# Altium PCB NB3000XN.PcbDoc (part 49 of 71)
Units mil, origin at the board's own origin, x right, y up, seen from the top; angles counter-clockwise.
Board outline 9527.56 x 6929.77 mil, 6 copper layers (Top Layer, GND+SHIELD, MidLayer1, MidLayer2, P2 - 3V3+5V0, Bottom Layer), stack 62.375 mil thick; 832 components, 1027 nets, 4655 pads, 4981 vias.
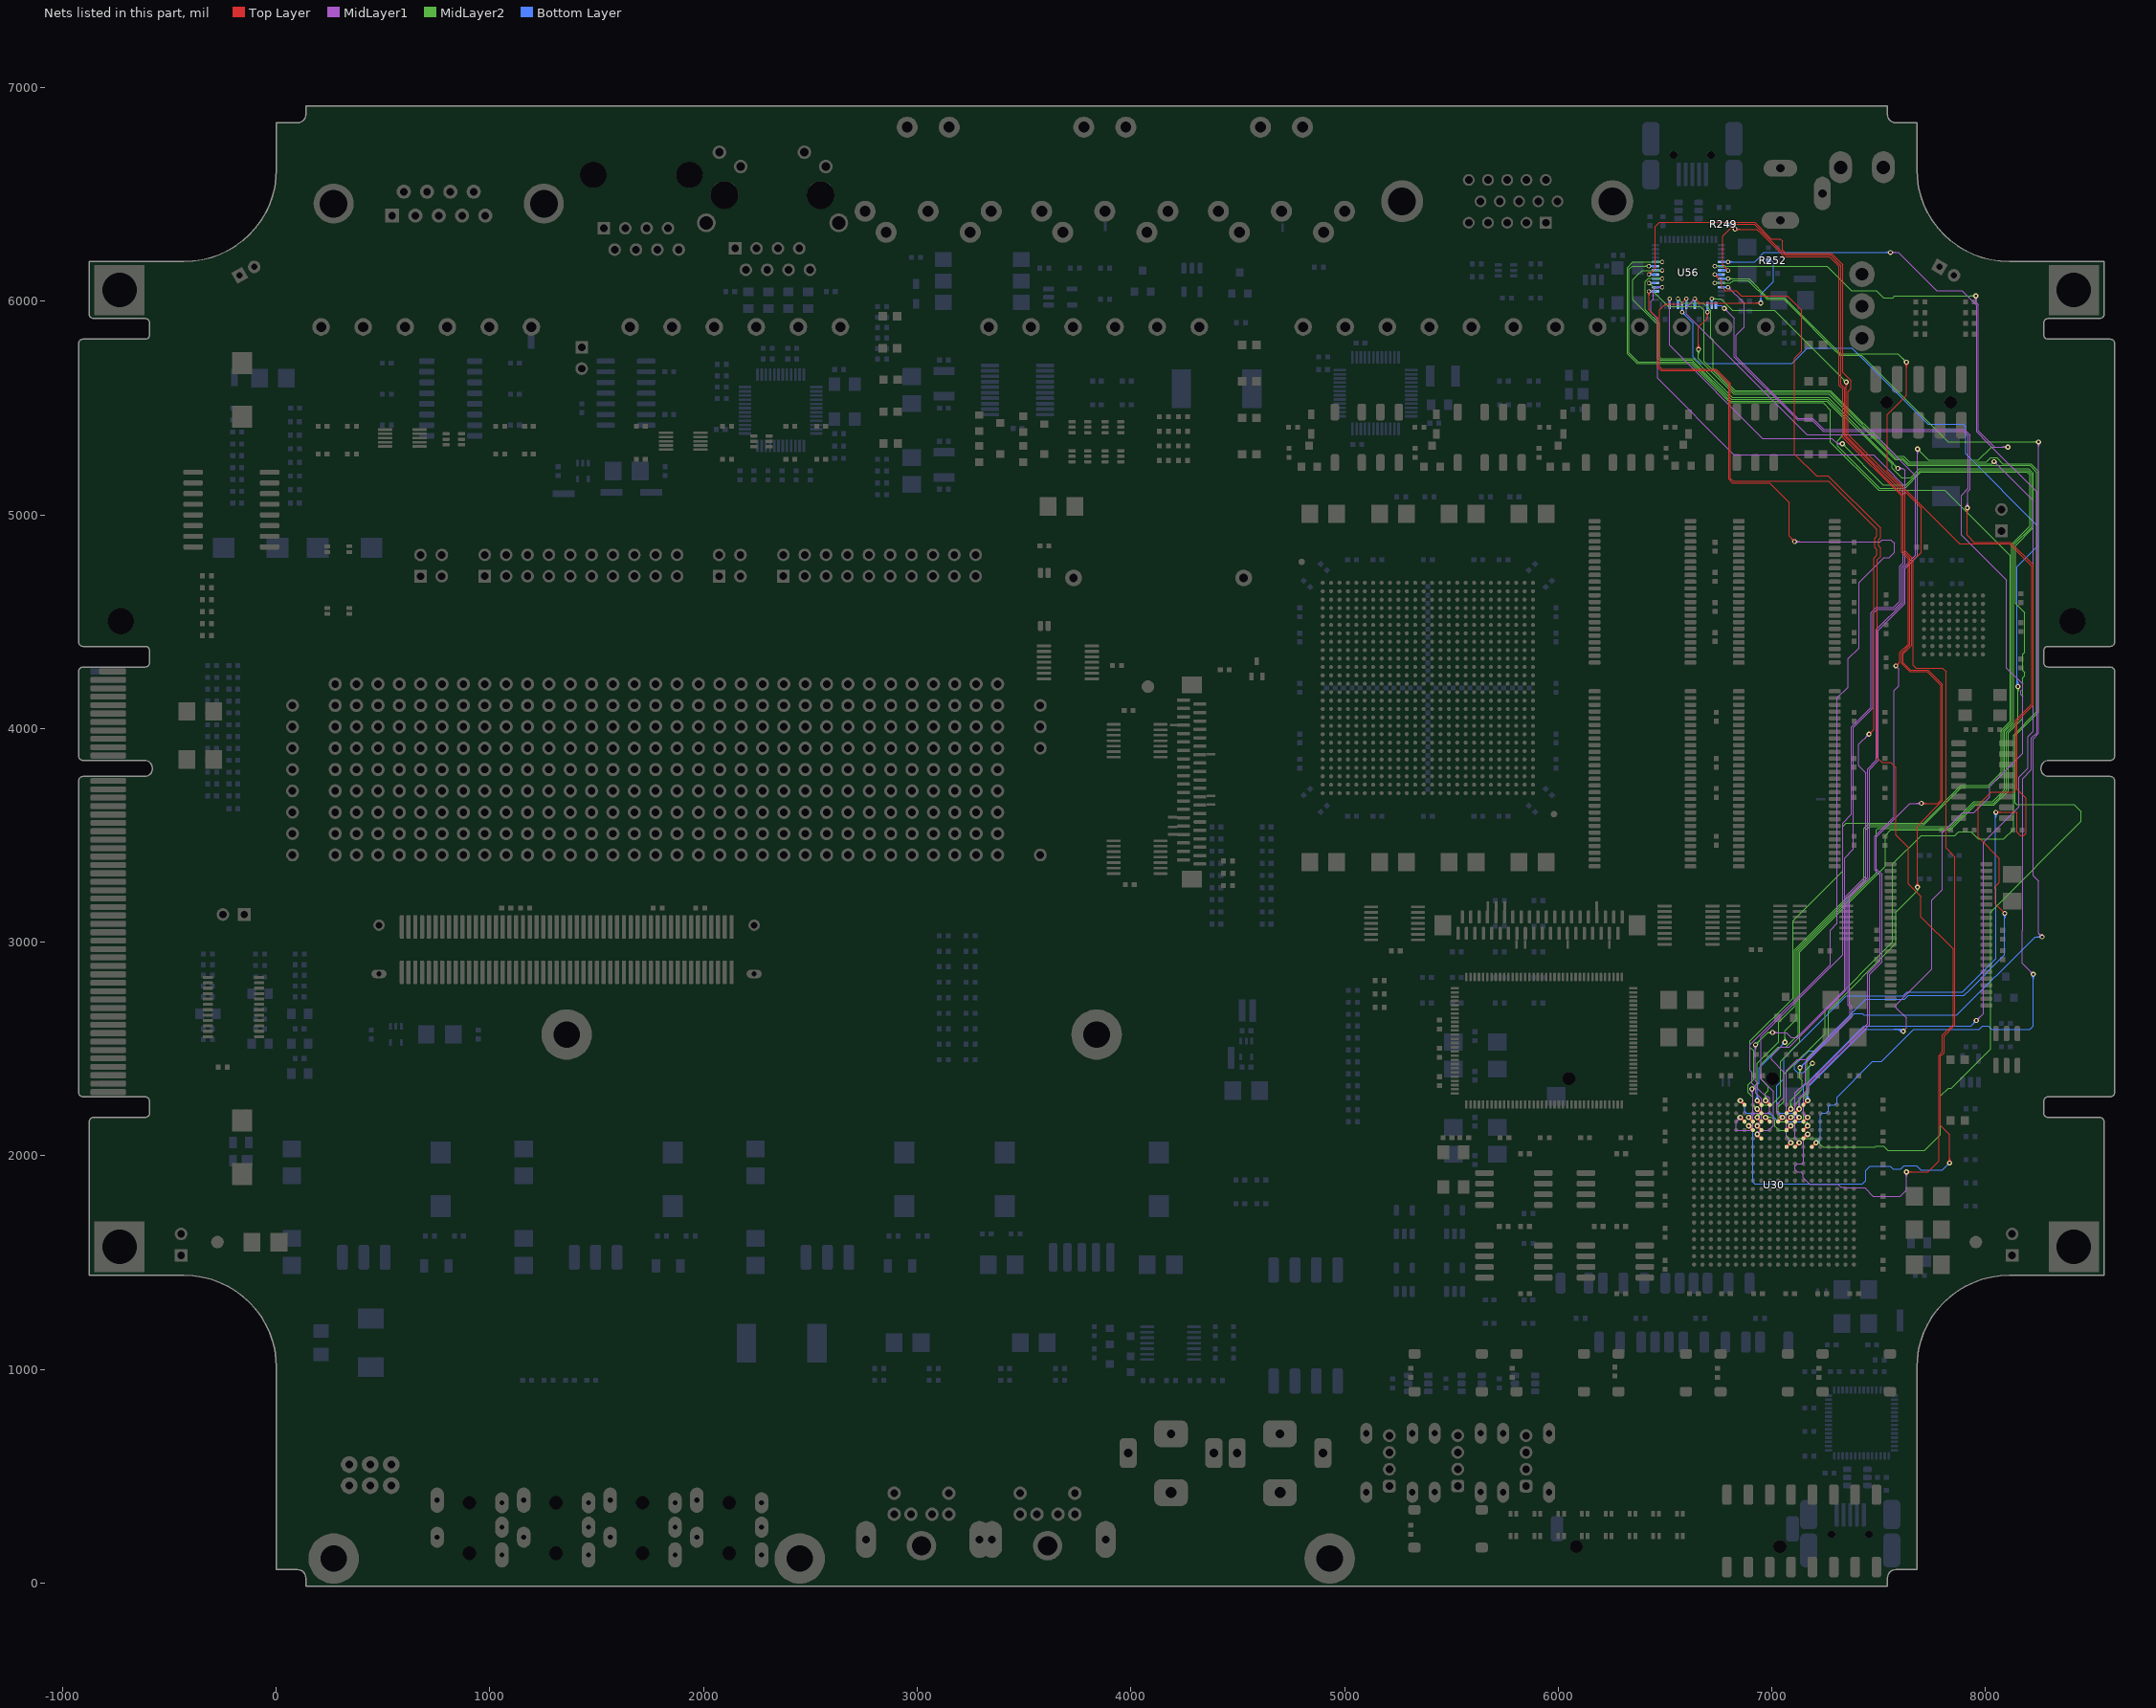
[diagram p53: the nets of this part, all layers, seen from the top]

## Via types
v1: diameter 23, hole 11.81, Top Layer to Bottom Layer, 3672 vias
v2: diameter 26, hole 11.81, Top Layer to Bottom Layer, 461 vias
v3: diameter 19, hole 11.81, Top Layer to Bottom Layer, tented both sides, 396 vias
v4: diameter 23.62, hole 11.81, Top Layer to Bottom Layer, 288 vias
v5: diameter 20, hole 11.81, Top Layer to Bottom Layer, 91 vias
v6: diameter 23, hole 11.81, Top Layer to Bottom Layer, tented both sides, 50 vias
v7: diameter 31, hole 11.81, Top Layer to Bottom Layer, 15 vias
v8: diameter 27.56, hole 11.81, Top Layer to Bottom Layer, tented both sides, 4 vias
v9: diameter 29, hole 11.81, Top Layer to Bottom Layer, 3 vias
v10: diameter 21, hole 11.81, Top Layer to Bottom Layer, 1 vias

## Nets (pads, with @x,y where several pads share a name; then routed paths per layer and width w, separated by ;. In a path a pad name is that pad's centre, name@x,y a point inside that pad or via, vN(x,y) a via of type N, cw(c..) or ccw(c..) an arc to the next point about the centre after c; other vN are vias at no path point) (continued)
HOST_USB.D1: U30.F6 U56.19 | length 6639.8
  Top Layer w8: U30.F6@7187.17,2042.17 v2(7206.85,2061.85) ; U30.F6@7187.17,2048.01 ccw(c7187.17,2062.11) 7197.14,2052.14 ccw(c7207.11,2042.17) U30.F6@7193.01,2042.17 ; v2@7197.85,2061.85 cw(c7176.12,2061.85) 7191.49,2046.49 cw(c7206.85,2031.12) v2@7206.85,2052.85
  MidLayer1 w4: v1(7554.86,6228.37) 7592.21,6228.37 7770.54,6050.04 7889.61,6050.04 7958.81,5980.84 7958.81,5388.73 8004.44,5343.11 8240.52,5107.02 8240.52,3980.73 8215.19,3955.39 8215.19,3808.37 8173.52,3766.71 8173.52,3055 ; v1@7558.75,6224.49 cw(c7568.14,6215.1) 7568.14,6228.37 cw(c7568.14,6241.65) v1@7558.75,6232.26 ; v1@7561.57,6221.66 cw(c7577.79,6205.44) 7577.79,6228.37 cw(c7577.79,6251.31) v1@7561.57,6235.09 ; 8175,3055 8173.19,3053.19 8173.19,2900.37 v1(8223.52,2850.04) ; v1@8214.02,2850.04 ccw(c8191.09,2850.04) 8207.31,2866.26 ccw(c8223.52,2882.48) v1@8223.52,2859.54 ; v1@8218.02,2850.04 ccw(c8204.75,2850.04) 8214.14,2859.43 ccw(c8223.52,2868.82) v1@8223.52,2855.54
  Bottom Layer w4: v5(6795.66,6184.21) 6919.36,6184.21 6963.52,6228.37 v1(7554.86,6228.37) ; v5@6801.32,6178.56 cw(c6814.97,6164.9) 6814.97,6184.21 cw(c6814.98,6203.53) v5@6801.32,6189.87 ; v2(7206.85,2061.85) 7206.85,2069.37 7214.38,2069.37 7227.19,2082.19 7227.19,2191.71 7235.52,2200.04 7254.19,2200.04 7265.52,2211.37 7265.52,2233.37 7271.19,2239.04 7293.86,2239.04 7304.86,2250.04 7304.86,2275.04 7471.52,2441.71 7514.52,2441.71 7664.52,2591.71 7969.52,2591.71 7986.19,2608.37 8012.86,2608.37 8029.52,2591.71 8206.86,2591.71 8223.52,2608.37 v1(8223.52,2850.04) ; v2@7206.85,2068.85 ccw(c7206.85,2085.75) 7218.8,2073.8 ; v2@7206.85,2072.85 ccw(c7206.85,2099.41) 7225.63,2080.63 ccw(c7244.41,2061.85) v2@7217.85,2061.85 ; v2@7213.85,2061.85 cw(c7230.75,2061.85) 7218.8,2073.8 ; v1@7548.14,6221.66 ccw(c7531.92,6205.44) 7531.92,6228.37 ccw(c7531.92,6251.31) v1@7548.14,6235.09 ; v1@7550.97,6224.49 ccw(c7541.58,6215.1) 7541.58,6228.37 ccw(c7541.58,6241.65) v1@7550.97,6232.26 ; v1@8216.81,2843.32 cw(c8200.59,2827.11) 8223.52,2827.11 cw(c8246.46,2827.11) v1@8230.24,2843.32 ; v1@8219.64,2846.15 cw(c8210.25,2836.76) 8223.52,2836.76 cw(c8236.8,2836.76) v1@8227.41,2846.15
  Bottom Layer w8: U56.19@6764.33,6184.21 v5(6795.66,6184.21) ; v5@6791.42,6179.97 ccw(c6781.18,6169.73) 6781.18,6184.21 ccw(c6781.17,6198.7) v5@6791.42,6188.46
HOST_USB.D2: U30.H6 U56.20 | length 6594.3
  Top Layer w8: U30.H6@7108.43,2042.17 v2(7128.11,2061.85) ; U30.H6@7108.43,2048.01 ccw(c7108.43,2062.11) 7118.4,2052.14 ccw(c7128.37,2042.17) U30.H6@7114.27,2042.17 ; v2@7119.11,2061.85 cw(c7097.38,2061.85) 7112.75,2046.49 cw(c7128.11,2031.12) v2@7128.11,2052.85
  MidLayer1 w4: v2(7128.11,2061.85) 7128.11,2058.37 7131.86,2058.37 7131.86,2060.37 7108.86,2083.37 7108.86,2293.71 7156.86,2341.71 7156.86,2433.37 7374.34,2650.86 7374.34,2698.16 7364.52,2707.98 7364.52,3210.08 7456.86,3302.41 7456.86,3808.37 7498.52,3850.04 7498.52,4459.84 7623.86,4585.17 7623.86,4749.77 7681.86,4807.77 v1(7681.86,5308.37) ; v1@7675.14,5301.66 cw(c7658.92,5285.44) 7681.86,5285.44 cw(c7704.79,5285.44) v1@7688.57,5301.66 ; v1@7677.97,5304.49 cw(c7668.58,5295.1) 7681.86,5295.1 cw(c7695.14,5295.1) v1@7685.75,5304.49 ; v4@7948.06,6018.06 cw(c7931.31,6001.31) 7955,6001.31 cw(c7978.69,6001.31) v4@7961.94,6018.06 ; v4@7950.89,6020.89 cw(c7940.97,6010.97) 7955,6010.97 cw(c7969.03,6010.97) v4@7959.11,6020.89 ; v4(7955,6025) 7955,5995.96 7966.81,5984.15 7966.81,5393.19 8042.19,5317.81 v4(8105,5317.81) ; v4@8098.06,5310.87 ccw(c8081.31,5294.13) 8081.31,5317.81 ccw(c8081.31,5341.5) v4@8098.06,5324.75 ; v4@8100.89,5313.7 ccw(c8090.97,5303.78) 8090.97,5317.81 ccw(c8090.97,5331.84) v4@8100.89,5321.92
  MidLayer2 w4: v5(6733,6164.53) 7259.04,6164.53 7373.52,6050.04 7490.19,6050.04 7523.04,6017.19 7567.19,6017.19 7575,6025 v4(7955,6025) ; v5@6738.66,6158.87 cw(c6752.31,6145.21) 6752.31,6164.53 cw(c6752.31,6183.84) v5@6738.66,6170.18 ; v1@7681.86,5298.87 cw(c7681.86,5275.94) 7698.07,5292.16 cw(c7714.29,5308.37) v1@7691.36,5308.37 ; v1@7681.86,5302.87 cw(c7681.86,5289.6) 7691.25,5298.99 cw(c7700.64,5308.37) v1@7687.36,5308.37 ; v1(7681.86,5308.37) 7734.23,5256 7966,5256 8027.81,5317.81 v4(8105,5317.81) ; v4@7948.06,6018.06 ccw(c7931.31,6001.31) 7931.31,6025 ccw(c7931.31,6048.69) v4@7948.06,6031.94 ; v4@7950.89,6020.89 ccw(c7940.97,6010.97) 7940.97,6025 ccw(c7940.97,6039.03) v4@7950.89,6029.11 ; v4@8098.06,5310.87 ccw(c8081.31,5294.13) 8081.31,5317.81 ccw(c8081.31,5341.5) v4@8098.06,5324.75 ; v4@8100.89,5313.7 ccw(c8090.97,5303.78) 8090.97,5317.81 ccw(c8090.97,5331.84) v4@8100.89,5321.92
  Bottom Layer w8: v5(6733,6164.53) U56.20@6764.33,6164.53 ; v5@6737.24,6160.28 cw(c6747.49,6150.04) 6747.49,6164.53 cw(c6747.49,6179.01) v5@6737.24,6168.77
HOST_USB.D3: U30.G3 U56.21 | length 5809.5
  Top Layer w4: 6782.01,6158.5 cw(c6768.35,6144.84) v5@6787.66,6144.84 ; 6782,6158.5 ccw(c6795.66,6172.16) v5@6795.66,6152.84 ; v5(6795.66,6144.84) 6770,6170.5 6770,6304.85 6825.19,6360.04 6917.84,6360.04 7061.17,6216.71 7273.52,6216.71 7323.52,6166.71 7323.52,5610 7340.52,5593 7340.52,5366.37 7363.05,5343.85 7615.19,5091.71 7615.19,4828.37 7646.52,4797.04 7646.52,4392.69 7606.86,4353.02 7606.86,4305 7644.86,4267 7726.69,4267 7791.19,4202.5 7791.19,3665.33 7775.86,3650 v1(7700,3650) ; v1@7703.89,3646.11 cw(c7713.28,3636.72) 7713.28,3650 cw(c7713.28,3663.28) v1@7703.89,3653.89 ; v1@7706.72,3643.28 cw(c7722.94,3627.06) 7722.94,3650 cw(c7722.94,3672.93) v1@7706.72,3656.72
  Top Layer w8: U30.G3@7147.8,2160.28 v2(7167.48,2179.96) ; U30.G3@7147.8,2166.12 ccw(c7147.8,2180.22) 7157.77,2170.25 ccw(c7167.74,2160.28) U30.G3@7153.64,2160.28 ; v2@7158.48,2179.96 cw(c7136.75,2179.96) 7152.12,2164.6 cw(c7167.48,2149.23) v2@7167.48,2170.96
  MidLayer1 w4: v2@7156.48,2179.96 ccw(c7129.92,2179.96) 7148.7,2198.74 ccw(c7167.48,2217.52) v2@7167.48,2190.96 ; v2@7160.48,2179.96 ccw(c7143.58,2179.96) 7155.53,2191.91 ccw(c7167.48,2203.86) v2@7167.48,2186.96 ; v2(7167.48,2179.96) 7148.19,2199.25 7148.19,2275.37 7173.19,2300.37 7173.19,2331.67 7457.19,2615.67 7457.19,2850.37 7515.19,2908.37 7515.19,3316.71 7490.19,3341.71 7490.19,3493.33 7646.86,3650 v1(7700,3650) ; v1@7693.28,3643.28 ccw(c7677.06,3627.06) 7677.06,3650 ccw(c7677.06,3672.93) v1@7693.28,3656.72 ; v1@7696.11,3646.11 ccw(c7686.72,3636.72) 7686.72,3650 ccw(c7686.72,3663.28) v1@7696.11,3653.89
  Bottom Layer w8: U56.21@6764.33,6144.84 v5(6795.66,6144.84) ; v5@6791.42,6140.6 ccw(c6781.18,6130.36) 6781.18,6144.84 ccw(c6781.18,6159.33) v5@6791.42,6149.09
HOST_USB.D4: U30.G5 U56.22 | length 6301.8
  Top Layer w4: v5@6733,6117.16 cw(c6733,6097.84) 6746.66,6111.5 cw(c6760.31,6125.16) v5@6741,6125.16 ; v5(6733,6125.16) 6765.19,6092.97 6765.19,6066.71 6781.86,6050.04 6831.86,6050.04 6856.86,6025.04 7073.52,6025.04 7140.19,5958.37 7140.19,5767.14 7106.52,5733.48 7106.52,5284.79 7208.27,5183.04 7263.15,5183.04 7508.19,4938 7508.19,4894.69 7499.19,4885.69 7499.19,4854.31 7508.19,4845.31 7508.19,4804.41 7494.19,4790.41 7494.19,3862.71 7515.19,3841.71 7556.86,3841.71 7581.86,3816.71 7581.86,3501.02 7640.19,3442.69 7640.19,3273.37 7698.19,3215.37 7698.19,3119 7849.19,2968 7849.19,2615 7798.52,2564.34 7798.52,2486.36 7781.86,2469.69 7781.86,1976.86 7730,1925 v1(7630,1925) ; v1@7633.89,1921.11 cw(c7643.28,1911.72) 7643.28,1925 cw(c7643.28,1938.28) v1@7633.89,1928.89 ; v1@7636.72,1918.28 cw(c7652.94,1902.06) 7652.94,1925 cw(c7652.94,1947.93) v1@7636.72,1931.72
  Top Layer w8: U30.G5@7147.8,2081.54 v2(7167.48,2101.22) ; U30.G5@7147.8,2087.38 ccw(c7147.8,2101.48) 7157.77,2091.51 ccw(c7167.74,2081.54) U30.G5@7153.64,2081.54 ; v2@7158.48,2101.22 cw(c7136.75,2101.22) 7152.12,2085.86 cw(c7167.48,2070.49) v2@7167.48,2092.22
  MidLayer1 w4: v2@7156.48,2101.22 cw(c7129.92,2101.22) 7148.7,2082.44 cw(c7167.48,2063.67) v2@7167.48,2090.22 ; v2@7160.48,2101.22 cw(c7143.58,2101.22) 7155.53,2089.27 cw(c7167.48,2077.32) v2@7167.48,2094.22 ; v2(7167.48,2101.22) 7148.19,2081.93 7148.19,1969.5 7141.43,1962.74 7120.24,1962.74 7109.11,1951.61 7109.11,1935.87 7120.24,1924.74 7134.61,1924.74 7147.11,1912.24 7147.11,1897.87 7177.78,1867.2 7309.34,1867.2 7323.92,1852.63 7336.14,1852.63 7338.56,1850.21 7435,1850.21 7473.71,1811.5 7601.69,1811.5 7630,1839.81 v1(7630,1925) ; v1@7623.28,1918.28 cw(c7607.06,1902.06) 7630,1902.06 cw(c7652.94,1902.06) v1@7636.72,1918.28 ; v1@7626.11,1921.11 cw(c7616.72,1911.72) 7630,1911.72 cw(c7643.28,1911.72) v1@7633.89,1921.11
  Bottom Layer w8: v5(6733,6125.16) U56.22@6764.33,6125.16 ; v5@6737.24,6120.91 cw(c6747.49,6110.67) 6747.49,6125.16 cw(c6747.49,6139.64) v5@6737.24,6129.4
HOST_USB.D5: U30.G4 U56.23 | length 6588.5
  Top Layer w4: v1@7623.28,5708.28 cw(c7607.06,5692.06) 7630,5692.06 cw(c7652.94,5692.06) v1@7636.72,5708.28 ; v1@7626.11,5711.11 cw(c7616.72,5701.72) 7630,5701.72 cw(c7643.28,5701.72) v1@7633.89,5711.11 ; v1(7630,5715) 7630,5560 7540,5470 7540,5203.46 7878.46,4865 8111.02,4865 8216.02,4760 8216.02,4114.05 8140,4038.03 8140,4010 ; v1(8090.19,3135.37) 8047.5,3178.06 8047.5,3262.25 8065.19,3279.94 8065.19,3391.71 7965.19,3491.71 7965.19,3641.71 8027.19,3703.71 8132.52,3703.71 8140.19,3711.37 8140.19,4010
  Top Layer w8: U30.G4@7147.8,2120.91 v2(7167.48,2140.59) ; U30.G4@7147.8,2126.75 ccw(c7147.8,2140.85) 7157.77,2130.88 ccw(c7167.74,2120.91) U30.G4@7153.64,2120.91 ; v2@7158.48,2140.59 cw(c7136.75,2140.59) 7152.12,2125.23 cw(c7167.48,2109.86) v2@7167.48,2131.59
  MidLayer2 w4: v5(6795.66,6105.47) 6845,6105.47 6893.09,6105.47 6981.86,6016.71 7059.84,6016.71 7321.54,5755 7590,5755 v1(7630,5715) ; v5@6801.32,6099.82 cw(c6814.97,6086.16) 6814.97,6105.47 cw(c6814.98,6124.79) v5@6801.32,6111.13 ; 7163.45,2158.41 cw(c7154.44,2149.4) v2@7164.99,2142.27 ; 7166.87,2154.98 cw(c7158.53,2146.64) v2@7168.31,2140.03 ; v2(7167.48,2140.59) 7167.48,2154.37 7163.48,2158.37 7156.52,2158.37 7148.19,2166.71 7148.19,2266.37 7173.52,2291.71 7173.52,2416.71 v1(7190.19,2433.37) ; v1@7180.69,2433.37 cw(c7157.76,2433.37) 7173.97,2417.16 cw(c7190.19,2400.94) v1@7190.19,2423.87 ; v1@7184.69,2433.37 cw(c7171.41,2433.37) 7180.8,2423.99 cw(c7190.19,2414.6) v1@7190.19,2427.87 ; v1@7620.5,5715 ccw(c7597.56,5715) 7613.78,5731.22 ccw(c7630,5747.43) v1@7630,5724.5 ; v1@7624.5,5715 ccw(c7611.22,5715) 7620.61,5724.39 ccw(c7630,5733.78) v1@7630,5720.5
  Bottom Layer w4: v1@7180.69,2433.37 cw(c7157.76,2433.37) 7173.97,2417.16 cw(c7190.19,2400.94) v1@7190.19,2423.87 ; v1@7184.69,2433.37 cw(c7171.41,2433.37) 7180.8,2423.99 cw(c7190.19,2414.6) v1@7190.19,2427.87 ; v1(7190.19,2433.37) 7148.52,2391.71 7118.52,2391.71 7106.86,2403.37 7106.86,2425.04 7173.52,2491.71 7198.52,2491.71 7440.19,2733.37 7621.15,2733.37 7638.48,2750.71 7899.19,2750.71 7925.26,2776.78 8090.19,2941.71 v1(8090.19,3135.37) ; v1@8083.47,3128.66 cw(c8067.26,3112.44) 8090.19,3112.44 cw(c8113.13,3112.44) v1@8096.91,3128.66 ; v1@8086.3,3131.49 cw(c8076.91,3122.1) 8090.19,3122.1 cw(c8103.47,3122.1) v1@8094.08,3131.49
  Bottom Layer w8: U56.23@6764.33,6105.47 v5(6795.66,6105.47) ; v5@6791.42,6101.23 ccw(c6781.18,6090.99) 6781.18,6105.47 ccw(c6781.18,6119.96) v5@6791.42,6109.72
HOST_USB.D6: U30.J2 U56.24 | length 6369.9
  Top Layer w8: U30.J2@7069.06,2199.65 v2(7088.74,2219.33) ; U30.J2@7069.06,2205.49 ccw(c7069.06,2219.59) 7079.03,2209.62 ccw(c7089,2199.65) U30.J2@7074.9,2199.65 ; v2@7079.74,2219.33 cw(c7058.01,2219.33) 7073.38,2203.97 cw(c7088.74,2188.6) v2@7088.74,2210.33
  MidLayer1 w4: v1@8241.81,5334.99 cw(c8225.59,5318.77) 8248.52,5318.77 cw(c8271.46,5318.77) v1@8255.24,5334.99 ; v1@8244.64,5337.82 cw(c8235.25,5328.43) 8248.52,5328.43 cw(c8261.8,5328.43) v1@8252.41,5337.82 ; v1(8248.52,5341.71) 8248.52,3977.41 8223.52,3952.41 8223.52,3311.35 8248.19,3286.69 8248.19,3042.04 v1(8265.19,3025.04) ; v1@8255.69,3025.04 ccw(c8232.76,3025.04) 8248.97,3041.26 ccw(c8265.19,3057.48) v1@8265.19,3034.54 ; v1@8259.69,3025.04 ccw(c8246.41,3025.04) 8255.8,3034.43 ccw(c8265.19,3043.82) v1@8265.19,3030.54
  MidLayer2 w4: v5(6733,6085.79) 6806.86,6085.79 6818.54,6097.47 6889.78,6097.47 6978.54,6008.71 7056.52,6008.71 7098.52,5966.71 7283.03,5782.2 7318.23,5747 7419.23,5747 7790.81,5375.42 7824.52,5341.71 v1(8248.52,5341.71) ; v5@6738.66,6080.13 cw(c6752.31,6066.47) 6752.31,6085.79 cw(c6752.31,6105.1) v5@6738.66,6091.44 ; v2@7080.96,2227.11 ccw(c7062.18,2245.89) 7088.74,2245.89 ccw(c7115.3,2245.89) v2@7096.52,2227.11 ; v2@7083.79,2224.28 ccw(c7071.84,2236.23) 7088.74,2236.23 ccw(c7105.64,2236.23) v2@7093.69,2224.28 ; v2(7088.74,2219.33) 7088.74,2258.37 7142.5,2312.13 7142.5,2352.25 7131.86,2362.89 v1(7131.86,2413.04) ; v1@7125.14,2406.32 cw(c7108.92,2390.11) 7131.86,2390.11 cw(c7154.79,2390.11) v1@7138.57,2406.32 ; v1@7127.97,2409.15 cw(c7118.58,2399.76) 7131.86,2399.76 cw(c7145.14,2399.76) v1@7135.75,2409.15 ; v1@8241.81,5334.99 ccw(c8225.59,5318.77) 8225.59,5341.71 ccw(c8225.59,5364.64) v1@8241.81,5348.43 ; v1@8244.64,5337.82 ccw(c8235.25,5328.43) 8235.25,5341.71 ccw(c8235.25,5354.99) v1@8244.64,5345.6
  Bottom Layer w4: v1(7131.86,2413.04) 7385.52,2666.71 7423.52,2666.71 7431.86,2658.37 7865.19,2658.37 8231.86,3025.04 v1(8265.19,3025.04) ; v1@7131.86,2418.54 ccw(c7131.86,2431.82) 7141.25,2422.43 ccw(c7150.64,2413.04) v1@7137.36,2413.04 ; v1@7131.86,2422.54 ccw(c7131.86,2445.48) 7148.07,2429.26 ccw(c7164.29,2413.04) v1@7141.36,2413.04 ; v1@8258.47,3018.32 ccw(c8242.26,3002.11) 8242.26,3025.04 ccw(c8242.26,3047.98) v1@8258.47,3031.76 ; v1@8261.3,3021.15 ccw(c8251.91,3011.76) 8251.91,3025.04 ccw(c8251.91,3038.32) v1@8261.3,3028.93
  Bottom Layer w8: v5(6733,6085.79) U56.24@6764.33,6085.79 ; v5@6737.24,6081.54 cw(c6747.49,6071.3) 6747.49,6085.79 cw(c6747.49,6100.27) v5@6737.24,6090.03
HOST_USB.D7: U30.H3 U56.25 | length 6707
  Top Layer w4: v1@7908.47,5026.66 cw(c7892.26,5010.44) 7915.19,5010.44 cw(c7938.13,5010.44) v1@7921.91,5026.66 ; v1@7911.3,5029.49 cw(c7901.91,5020.1) 7915.19,5020.1 cw(c7928.47,5020.1) v1@7919.08,5029.49 ; v1(7915.19,5033.37) 7915.19,4904.81 7947,4873 8117,4873 8224.02,4765.98 8224.02,4110.74 8148.19,4034.91 8148.19,3715.5 8190.19,3673.5 8190.19,3511.37 8178.86,3500.04 8162.19,3500.04 8148.52,3513.71 8148.52,3604.37 8144.52,3608.37 v1(8048.52,3608.37) ; v1@8052.41,3604.49 cw(c8061.8,3595.1) 8061.8,3608.37 cw(c8061.8,3621.65) v1@8052.41,3612.26 ; v1@8055.24,3601.66 cw(c8071.46,3585.44) 8071.46,3608.37 cw(c8071.46,3631.31) v1@8055.24,3615.09
  Top Layer w8: U30.H3@7108.43,2160.28 v2(7128.11,2179.96) ; U30.H3@7108.43,2166.12 ccw(c7108.43,2180.22) 7118.4,2170.25 ccw(c7128.37,2160.28) U30.H3@7114.27,2160.28 ; v2@7119.11,2179.96 cw(c7097.38,2179.96) 7112.75,2164.6 cw(c7128.11,2149.23) v2@7128.11,2170.96
  MidLayer1 w4: v5@6795.66,6058.1 cw(c6795.66,6038.79) 6809.32,6052.45 cw(c6822.98,6066.1) v5@6803.66,6066.1 ; v5(6795.66,6066.1) 6866.32,5995.45 6870,5991.76 6870,5879 6833,5842 6833,5741.17 7121.82,5452.35 7190.86,5452.35 7243.17,5400.04 7902.25,5400.04 7928,5374.29 7928,5120.6 7916.36,5108.96 7916.36,5034.54 v1(7915.19,5033.37) ; v1@7908.47,5040.09 ccw(c7889.44,5059.13) 7916.36,5059.13 ; v1@7911.3,5037.26 ccw(c7899.09,5049.47) 7916.36,5049.47 ; 7916.36,5053.49 ccw(c7935.31,5053.49) v1@7921.91,5040.09
  Bottom Layer w4: v2@7117.11,2179.96 ccw(c7090.55,2179.96) 7109.33,2198.74 ccw(c7128.11,2217.52) v2@7128.11,2190.96 ; v2@7121.11,2179.96 ccw(c7104.21,2179.96) 7116.16,2191.91 ccw(c7128.11,2203.86) v2@7128.11,2186.96 ; v2(7128.11,2179.96) 7108.03,2200.04 7031.86,2200.04 7023.52,2208.37 7023.52,2329.04 7056.86,2362.37 7056.86,2458.37 7348.52,2750.04 7615.19,2750.04 7631.86,2766.71 7892.56,2766.71 8048.52,2922.67 8048.52,3246.73 8047.5,3247.75 8047.5,3607.35 v1(8048.52,3608.37) ; v1@8041.81,3601.66 cw(c8028.06,3587.91) 8047.5,3587.91 ; 8047.5,3582.97 cw(c8073.93,3582.97) v1@8055.24,3601.66 ; 8047.5,3592.62 cw(c8064.27,3592.62) v1@8052.41,3604.49
  Bottom Layer w8: U56.25@6764.33,6066.1 v5(6795.66,6066.1) ; v5@6791.42,6061.86 ccw(c6781.18,6051.62) 6781.18,6066.1 ccw(c6781.18,6080.59) v5@6791.42,6070.34
HOST_USB.D8: U30.P3 U56.45 | length 5759
  Top Layer w4: v5@6418.68,6040.76 cw(c6405.02,6027.1) 6424.34,6027.1 cw(c6443.65,6027.1) v5@6430,6040.76 ; v5@6423.52,6046.42 v5(6424.34,6046.42) 6424.34,5960.85 6465.19,5920 6465.19,5691.71 6481.86,5675.04 6735.5,5675.04 6785.27,5625.27 ; 6785,5625 6798.52,5611.48 6798.52,5166.71 6815.19,5150.04 6990.19,5150.04 7081.86,5058.37 7081.86,4900.04 v1(7106.86,4875.04) ; v1@7097.36,4875.04 ccw(c7074.42,4875.04) 7090.64,4891.26 ccw(c7106.86,4907.48) v1@7106.86,4884.54 ; v1@7101.36,4875.04 ccw(c7088.08,4875.04) 7097.47,4884.43 ccw(c7106.86,4893.82) v1@7106.86,4880.54
  Top Layer w8: v2@6852.52,2170.96 cw(c6852.52,2149.23) 6867.88,2164.6 cw(c6883.25,2179.96) v2@6861.52,2179.96 ; v2(6852.52,2179.96) U30.P3@6872.2,2160.28 ; U30.P3@6866.36,2160.28 ccw(c6852.26,2160.28) 6862.23,2170.25 ccw(c6872.2,2180.22) U30.P3@6872.2,2166.12
  MidLayer1 w4: v2@6841.52,2179.96 cw(c6814.96,2179.96) 6833.74,2161.18 cw(c6852.52,2142.4) v2@6852.52,2168.96 ; v2@6845.52,2179.96 cw(c6828.62,2179.96) 6840.57,2168.01 cw(c6852.52,2156.06) v2@6852.52,2172.96 ; v2(6852.52,2179.96) 6833.19,2160.63 6833.19,2122.37 6835.19,2120.37 6899.19,2120.37 6912.19,2133.37 6912.19,2188.71 6923.52,2200.04 6942.19,2200.04 6950.52,2208.37 6950.52,2267.37 6924.52,2293.37 6924.52,2321.71 6906.86,2339.37 6906.86,2391.71 6898.52,2400.04 6898.52,2519.69 7273.52,2894.69 7273.52,3055.39 7306.52,3088.39 7306.52,4143.39 7356.86,4193.73 7356.86,4326.86 7407.86,4377.86 7407.86,4683.37 7524.52,4800.04 7548.52,4800.04 7573.52,4825.04 7573.52,4866.48 7557.19,4882.81 7514.96,4882.81 7507.19,4875.04 v1(7106.86,4875.04) ; v1@7110.75,4871.15 cw(c7120.14,4861.76) 7120.14,4875.04 cw(c7120.14,4888.32) v1@7110.75,4878.93 ; v1@7113.57,4868.32 cw(c7129.79,4852.11) 7129.79,4875.04 cw(c7129.79,4897.98) v1@7113.57,4881.76
  Bottom Layer w8: v5(6424.34,6046.42) U56.45@6455.67,6046.42 ; v5@6428.58,6042.17 cw(c6438.82,6031.93) 6438.82,6046.42 cw(c6438.82,6060.9) v5@6428.58,6050.66
HOST_USB.D9: U30.M5 U56.46 | length 5520.1
  Top Layer w8: v2@6931.26,2092.22 cw(c6931.26,2070.49) 6946.62,2085.86 cw(c6961.99,2101.22) v2@6940.26,2101.22 ; v2(6931.26,2101.22) U30.M5@6950.94,2081.54 ; U30.M5@6945.1,2081.54 ccw(c6931,2081.54) 6940.97,2091.51 ccw(c6950.94,2101.48) U30.M5@6950.94,2087.38
  MidLayer1 w4: 6466.22,6066.71 cw(c6466.22,6045.33) v5@6481.34,6060.45 ; 6469.15,6066.71 ccw(c6469.15,6083.95) v5@6481.34,6071.76 ; 6475.88,6066.71 cw(c6475.88,6054.98) v5@6484.17,6063.27 ; v5(6487,6066.1) 6481.86,6066.1 6481.86,6066.71 6460,6066.71 6445,6051.71 6445,6010 6435,6000 6435,5950 6465,5920 6465,5638.92 6821.92,5282 7474.9,5282 7529.71,5227.19 7615.19,5141.71 7615.19,4775.04 7599.86,4759.71 7599.86,4596.02 7570.54,4566.71 7490.19,4566.71 7465.19,4541.71 7465.19,4099.37 7373.52,4007.71 7373.52,3600.04 7331.86,3558.37 7331.86,2941.71 6948.52,2558.37 6948.52,2358.37 7006.86,2300.04 7006.86,2141.71 6985.52,2120.37 6950.41,2120.37 v2(6931.26,2101.22) ; v2@6931.26,2108.22 ccw(c6931.26,2125.12) 6943.21,2113.17 ccw(c6955.16,2101.22) v2@6938.26,2101.22 ; v2@6931.26,2112.22 ccw(c6931.26,2138.78) 6950.04,2120 ccw(c6968.82,2101.22) v2@6942.26,2101.22
  Bottom Layer w8: U56.46@6455.67,6066.1 v5(6487,6066.1) ; v5@6482.76,6061.86 ccw(c6472.51,6051.62) 6472.51,6066.1 ccw(c6472.51,6080.59) v5@6482.76,6070.35
HOST_USB.D10: U30.P1 U56.47 | length 6788.8
  Top Layer w8: v2@6852.52,2249.7 cw(c6852.52,2227.97) 6867.88,2243.34 cw(c6883.25,2258.7) v2@6861.52,2258.7 ; v2(6852.52,2258.7) U30.P1@6872.2,2239.02 ; U30.P1@6866.36,2239.02 ccw(c6852.26,2239.02) 6862.23,2248.99 ccw(c6872.2,2258.96) U30.P1@6872.2,2244.86
  MidLayer1 w4: v1(7956.86,2633.37) 7989.86,2666.37 7989.86,3466.37 7998.52,3475.04 8156.86,3633.37 8156.86,3773.17 8199.19,3815.5 8199.19,3962.02 8224.52,3987.35 8224.52,5065.71 v1(8040.19,5250.04) ; v1@7956.86,2638.87 ccw(c7956.86,2652.15) 7966.25,2642.76 ccw(c7975.64,2633.37) v1@7962.36,2633.37 ; v1@7956.86,2642.87 ccw(c7956.86,2665.81) 7973.07,2649.59 ccw(c7989.29,2633.37) v1@7966.36,2633.37 ; v1@8040.19,5240.54 cw(c8040.19,5217.61) 8056.41,5233.82 cw(c8072.63,5250.04) v1@8049.69,5250.04 ; v1@8040.19,5244.54 cw(c8040.19,5231.26) 8049.58,5240.65 cw(c8058.97,5250.04) v1@8045.69,5250.04
  MidLayer2 w4: v5@6424.34,6077.79 cw(c6424.34,6058.47) 6438,6072.13 cw(c6451.65,6085.79) v5@6432.34,6085.79 ; v5(6424.34,6085.79) 6450.14,6059.99 6450.14,6040.97 6516.06,5975.04 6665.19,5975.04 6681.86,5958.37 6681.86,5717.32 6824.8,5574.37 7271.82,5574.37 7579.48,5266.71 7612.82,5266.71 7639.53,5240 8030,5240 v1@8040,5250 ; v1@8040.07,5249.93 v1(8040.19,5250.04)
  Bottom Layer w4: v2@6852.52,2247.7 cw(c6852.52,2221.14) 6871.3,2239.92 cw(c6890.08,2258.7) v2@6863.52,2258.7 ; v2@6852.52,2251.7 cw(c6852.52,2234.8) 6864.47,2246.75 cw(c6876.42,2258.7) v2@6859.52,2258.7 ; v2(6852.52,2258.7) 6872.86,2238.36 6872.86,2208.04 6880.86,2200.04 6989.19,2200.04 7029.52,2159.71 7146.19,2159.71 7148.19,2161.71 7148.19,2324.71 7431.86,2608.37 7931.86,2608.37 v1(7956.86,2633.37) ; v1@7947.36,2633.37 cw(c7924.42,2633.37) 7940.64,2617.16 cw(c7956.86,2600.94) v1@7956.86,2623.87 ; v1@7951.36,2633.37 cw(c7938.08,2633.37) 7947.47,2623.99 cw(c7956.86,2614.6) v1@7956.86,2627.87
  Bottom Layer w8: v5(6424.34,6085.79) U56.47@6455.67,6085.79 ; v5@6428.58,6081.54 cw(c6438.82,6071.3) 6438.82,6085.79 cw(c6438.82,6100.27) v5@6428.58,6090.03
HOST_USB.D11: U30.M4 U56.48 | length 6076.9
  Top Layer w8: v2@6931.26,2131.59 cw(c6931.26,2109.86) 6946.62,2125.23 cw(c6961.99,2140.59) v2@6940.26,2140.59 ; v2(6931.26,2140.59) U30.M4@6950.94,2120.91 ; U30.M4@6945.1,2120.91 ccw(c6931,2120.91) 6940.97,2130.88 ccw(c6950.94,2140.85) U30.M4@6950.94,2126.75
  MidLayer1 w4: v1@6916.81,2512.99 cw(c6900.59,2496.77) 6923.52,2496.77 cw(c6946.46,2496.77) v1@6930.24,2512.99 ; v1@6919.64,2515.82 cw(c6910.25,2506.43) 6923.52,2506.43 cw(c6936.8,2506.43) v1@6927.41,2515.82 ; v1(6923.52,2519.71) 6923.52,2352.71 6934.52,2341.71 6934.52,2314.04 6970.86,2277.71 6981.86,2277.71 6990.19,2269.37 6990.19,2208.37 6981.86,2200.04 6955.86,2200.04 6950.86,2195.04 6950.86,2160.71 6931.26,2141.11 v2(6931.26,2140.59) ; v2@6931.26,2147.59 ccw(c6931.26,2163.23) 6942.32,2152.17 ; v2@6931.26,2151.59 ccw(c6931.26,2176.89) 6949.15,2159 ; v2@6938.26,2140.59 cw(c6956.41,2140.59) 6943.58,2153.43 ; v2@6942.26,2140.59 cw(c6970.07,2140.59) 6950.41,2160.26 ; v1(7003.19,2577.37) 7067.63,2577.37 7090,2555 7117.17,2555 7340.19,2778.02 7340.19,3395 7381.86,3436.67 7381.86,4004.73 7473.52,4096.39 7473.52,4538.73 7493.5,4558.71 7573.86,4558.71 7607.86,4592.71 7607.86,4756.39 7623.52,4772.06 7623.52,5209.18 7615,5217.71 v1(7590.19,5217.71) ; v1@7007.08,2573.49 cw(c7016.47,2564.1) 7016.47,2577.37 cw(c7016.47,2590.65) v1@7007.08,2581.26 ; v1@7009.91,2570.66 cw(c7026.13,2554.44) 7026.13,2577.37 cw(c7026.13,2600.31) v1@7009.91,2584.09 ; v1@7594.08,5213.82 cw(c7603.47,5204.43) 7603.47,5217.71 cw(c7603.47,5230.99) v1@7594.08,5221.6 ; v1@7596.91,5210.99 cw(c7613.13,5194.77) 7613.13,5217.71 cw(c7613.13,5240.64) v1@7596.91,5224.43
  MidLayer2 w4: 6460.68,6108.37 cw(c6460.68,6079.15) v5@6481.34,6099.82 ; 6470.34,6108.37 cw(c6470.34,6088.81) v5@6484.17,6102.64 ; 6474.69,6108.37 ccw(c6474.69,6117.78) v5@6481.34,6111.13 ; v5(6487,6105.47) 6481.86,6105.47 6481.86,6108.37 6423.52,6108.37 6406.86,6091.71 6406.86,5961.36 6473.52,5894.69 6473.52,5737.79 6478.94,5732.37 6632.86,5732.37 6664.64,5700.59 6815.19,5550.04 7262.21,5550.04 7570.83,5241.42 7570.83,5237.07 v1(7590.19,5217.71) ; v1(6923.52,2519.71) 6981.19,2577.37 ; v1@6923.52,2525.21 ccw(c6923.52,2538.49) 6932.91,2529.1 ccw(c6942.3,2519.71) v1@6929.02,2519.71 ; v1@6923.52,2529.21 ccw(c6923.52,2552.14) 6939.74,2535.93 ccw(c6955.96,2519.71) v1@6933.02,2519.71 ; v1(7003.19,2577.37) 6981.19,2577.37 ; v1@7580.69,5217.71 ccw(c7557.76,5217.71) 7573.97,5233.93 ccw(c7590.19,5250.14) v1@7590.19,5227.21 ; v1@7584.69,5217.71 ccw(c7571.41,5217.71) 7580.8,5227.1 ccw(c7590.19,5236.49) v1@7590.19,5223.21 ; 6981.19,2577.37 cw(c6981.19,2556.66) 6996.27,2570.86 ccw(c6981.19,2556.66) 6981.19,2577.37 ; 6981.19,2577.37 ccw(c6981.19,2598.09) 6996.27,2583.89 cw(c6981.19,2598.09) 6981.19,2577.37 ; 6990.45,2577.37 cw(c6990.45,2565.38) 6999.19,2573.6 ccw(c6990.45,2565.38) 6990.45,2577.37 ; 6990.45,2577.37 ccw(c6990.45,2589.37) 6999.19,2581.15 cw(c6990.45,2589.37) 6990.45,2577.37
  Bottom Layer w8: U56.48@6455.67,6105.47 v5(6487,6105.47) ; v5@6482.76,6101.23 ccw(c6472.51,6090.99) 6472.51,6105.47 ccw(c6472.51,6119.96) v5@6482.76,6109.72
HOST_USB.D12: U30.N4 U56.49 | length 7395.9
  Top Layer w4: v5(6424.34,6125.16) 6455,6155.82 6455,6350 6475,6370 6919.19,6370 6996.69,6292.5 7040,6292.5 7050,6282.5 7050,6239.19 7064.48,6224.71 7277.79,6224.71 7331.52,6170.98 7331.52,5667.04 7370.38,5628.19 7370.38,5590.38 7356.52,5576.52 7356.52,5375.63 7698.52,5033.63 7698.52,4825.04 7662.52,4789.04 7662.52,4296.37 7675.52,4283.37 7798.52,4283.37 7815.19,4266.71 7815.19,3440 7857.19,3398 7857.19,2611.69 7806.86,2561.36 7806.86,2483.37 7790.19,2466.71 7790.19,2141.71 7831.86,2100.04 v1(7831.86,1966.71) ; v5@6424.34,6133.16 ccw(c6424.34,6152.47) 6438,6138.82 ccw(c6451.65,6125.16) v5@6432.34,6125.16 ; v1@7825.14,1973.43 ccw(c7808.92,1989.64) 7831.86,1989.64 ccw(c7854.79,1989.64) v1@7838.57,1973.43 ; v1@7827.97,1970.6 ccw(c7818.58,1979.99) 7831.86,1979.99 ccw(c7845.14,1979.99) v1@7835.75,1970.6
  Top Layer w8: v2@6891.89,2131.59 cw(c6891.89,2109.86) 6907.25,2125.23 cw(c6922.62,2140.59) v2@6900.89,2140.59 ; v2(6891.89,2140.59) U30.N4@6911.57,2120.91 ; U30.N4@6905.73,2120.91 ccw(c6891.63,2120.91) 6901.6,2130.88 ccw(c6911.57,2140.85) U30.N4@6911.57,2126.75
  Bottom Layer w4: v2@6891.89,2129.59 cw(c6891.89,2103.03) 6910.67,2121.81 cw(c6929.44,2140.59) v2@6902.89,2140.59 ; v2@6891.89,2133.59 cw(c6891.89,2116.69) 6903.84,2128.64 cw(c6915.79,2140.59) v2@6898.89,2140.59 ; v2(6891.89,2140.59) 6911.52,2120.96 6911.52,1878.48 6921,1869 7425,1869 7440.02,1884.02 7440.02,1932.58 7459.82,1952.37 7553.94,1952.37 7567.81,1938.5 7602.19,1938.5 7617.9,1954.21 7677.77,1954.21 7697.98,1934 7799.15,1934 v1(7831.86,1966.71)
  Bottom Layer w8: v5(6424.34,6125.16) U56.49@6455.67,6125.16 ; v5@6428.58,6120.91 cw(c6438.82,6110.67) 6438.82,6125.16 cw(c6438.82,6139.64) v5@6428.58,6129.4
HOST_USB.D13: U30.M3 U56.50 | length 6692
  Top Layer w8: v2@6931.26,2170.96 cw(c6931.26,2149.23) 6946.62,2164.6 cw(c6961.99,2179.96) v2@6940.26,2179.96 ; v2(6931.26,2179.96) U30.M3@6950.94,2160.28 ; U30.M3@6945.1,2160.28 ccw(c6931,2160.28) 6940.97,2170.25 ccw(c6950.94,2180.22) U30.M3@6950.94,2166.12
  MidLayer2 w4: v5@6481.34,6139.19 ccw(c6467.69,6125.53) 6467.69,6144.84 ccw(c6467.69,6164.16) v5@6481.34,6150.5 ; v5(6487,6144.84) 6393.33,6144.84 6373.52,6125.04 6350,6101.52 6350,6006.9 6373.52,5983.37 6465.19,5891.71 6465.19,5734.81 6475.63,5724.37 6627.19,5724.37 6636.89,5714.68 6809.86,5541.71 7259.23,5541.71 7562.83,5238.11 7562.83,5219.07 7606.86,5175.04 7650.11,5175.04 7691.07,5216 8201.37,5216 8223.86,5193.52 8223.86,4941.05 8139.86,4857.05 8139.86,4585.33 8182.81,4542.38 8182.81,4356.66 8173.52,4347.37 8173.52,4271.66 8182.81,4262.38 8182.81,4247.62 8173.52,4238.34 8173.52,4047.04 8106.86,3980.37 8106.86,3708.37 8040.19,3641.71 7952.19,3641.71 7835.52,3525.04 7556.86,3525.04 7531.86,3500.04 7531.86,3355.39 7131.86,2955.39 7131.86,2533.37 7040.19,2441.71 7040.19,2281.04 6998.52,2239.37 6962.86,2239.37 6950.52,2227.04 6950.52,2211.37 ; v2@6930.28,2179.75 cw(c6947.37,2183.48) 6935,2195.85 ; v2(6931.26,2179.96) 6931.86,2180.56 6931.86,2192.71 6950.52,2211.37 ; v2@6934.19,2180.6 cw(c6955.86,2185.34) 6940.18,2201.03 ; v2@6938.1,2181.46 cw(c6964.35,2187.2) 6945.35,2206.2 ; v2@6942.01,2182.31 cw(c6972.84,2189.05) 6950.52,2211.37
  Bottom Layer w8: U56.50@6455.67,6144.84 v5(6487,6144.84) ; v5@6482.76,6140.6 ccw(c6472.51,6130.36) 6472.51,6144.84 ccw(c6472.51,6159.33) v5@6482.76,6149.09
HOST_USB.D14: U30.N3 U56.51 | length 6868
  Top Layer w8: v2@6891.89,2170.96 cw(c6891.89,2149.23) 6907.25,2164.6 cw(c6922.62,2179.96) v2@6900.89,2179.96 ; v2(6891.89,2179.96) U30.N3@6911.57,2160.28 ; U30.N3@6905.73,2160.28 ccw(c6891.63,2160.28) 6901.6,2170.25 ccw(c6911.57,2180.22) U30.N3@6911.57,2166.12
  MidLayer1 w4: v2(6891.89,2179.96) 6911.19,2199.26 6911.19,2309.04 v1(6906.86,2313.37) ; v1@6900.14,2306.66 cw(c6873.46,2279.98) 6911.19,2279.98 ; v1@6902.97,2309.49 cw(c6883.12,2289.64) 6911.19,2289.64 ; v1@6905.8,2312.31 cw(c6892.78,2299.29) 6911.19,2299.29 ; 6911.19,2300.9 cw(c6919.33,2300.9) v1@6913.57,2306.66
  MidLayer2 w4: v5@6418.68,6158.87 ccw(c6405.04,6145.23) 6405.04,6164.52 ccw(c6405.01,6183.86) v5@6418.68,6170.18 ; v5@6424.34,6166.71 6424.34,6164.52 6346.34,6164.52 6331.86,6150.04 6331.86,5758.37 6365.19,5725.04 6373.86,5716.37 6623.88,5716.37 6759.26,5580.99 6806.88,5533.37 7256.25,5533.37 7335,5454.62 7335,5375 7306.86,5346.86 7306.86,5322.04 7503.86,5125.04 7622.74,5125.04 7697.7,5200 8194.74,5200 8207.86,5186.89 8207.86,4947.67 8123.52,4863.34 8123.52,4030.98 8081.86,3989.32 8081.86,3791.04 8015.86,3725.04 7887.82,3725.04 7712.82,3550.04 7448.52,3550.04 7431.86,3533.37 7431.86,3289.34 7106.86,2964.34 7106.86,2700.04 7031.86,2625.04 7031.86,2533.37 6931.86,2433.37 6931.86,2338.37 v1(6906.86,2313.37) ; v1@6906.86,2318.87 ccw(c6906.86,2332.15) 6916.25,2322.76 ccw(c6925.64,2313.37) v1@6912.36,2313.37 ; v1@6906.86,2322.87 ccw(c6906.86,2345.81) 6923.07,2329.59 ccw(c6939.29,2313.37) v1@6916.36,2313.37
  Bottom Layer w8: v5(6424.34,6164.53) U56.51@6455.67,6164.53 ; v5@6428.58,6160.28 cw(c6438.82,6150.04) 6438.82,6164.53 cw(c6438.82,6179.01) v5@6428.58,6168.77
HOST_USB.D15: U30.M2 U56.52 | length 6510.9
  Top Layer w8: v2@6931.26,2210.33 cw(c6931.26,2188.6) 6946.62,2203.97 cw(c6961.99,2219.33) v2@6940.26,2219.33 ; v2(6931.26,2219.33) U30.M2@6950.94,2199.65 ; U30.M2@6945.1,2199.65 ccw(c6931,2199.65) 6940.97,2209.62 ccw(c6950.94,2219.59) U30.M2@6950.94,2205.49
  MidLayer2 w4: 6465.66,6183.37 ccw(c6465.66,6205.55) v5@6481.34,6189.87 ; 6469.71,6183.37 cw(c6469.71,6166.92) v5@6481.34,6178.56 ; 6475.32,6183.37 ccw(c6475.32,6195.89) v5@6484.17,6187.04 ; v5@6487,6183.37 6348.52,6183.37 6323.52,6158.37 6323.52,5754.85 6370,5708.37 6620.56,5708.37 6803.9,5525.04 7239.96,5525.04 7275,5490 7275,5340 7500,5115 7808.56,5115 8115.19,4808.37 8115.19,4033.96 8073.52,3992.3 8073.52,3794.02 8012.88,3733.37 7884.84,3733.37 7709.84,3558.37 7348.52,3558.37 7331.86,3541.71 7331.86,3333.37 7098.52,3100.04 7098.52,2737.37 6898.52,2537.37 6898.52,2507.37 6915.19,2490.71 6915.19,2360.04 6888.52,2333.37 6888.52,2297.04 6912.19,2273.37 6912.19,2238.4 v2(6931.26,2219.33) ; v2@6920.26,2219.33 ccw(c6893.7,2219.33) 6912.48,2238.11 ccw(c6931.26,2256.89) v2@6931.26,2230.33 ; v2@6924.26,2219.33 ccw(c6907.36,2219.33) 6919.31,2231.28 ccw(c6931.26,2243.23) v2@6931.26,2226.33
  Bottom Layer w8: U56.52@6455.67,6184.21 v5(6487,6184.21) ; v5@6482.76,6179.97 ccw(c6472.51,6169.73) 6472.51,6184.21 ccw(c6472.52,6198.7) v5@6482.76,6188.46
HOST_USB.FIFOADR0: U30.L1 U56.37 | length 6197.4
  Top Layer w8: v2@6970.63,2249.7 cw(c6970.63,2227.97) 6985.99,2243.34 cw(c7001.36,2258.7) v2@6979.63,2258.7 ; v2(6970.63,2258.7) U30.L1@6990.31,2239.02 ; U30.L1@6984.47,2239.02 ccw(c6970.37,2239.02) 6980.34,2248.99 ccw(c6990.31,2258.96) U30.L1@6990.31,2244.86
  MidLayer2 w4: v2@6962.85,2266.48 ccw(c6944.07,2285.26) 6970.63,2285.26 ccw(c6997.19,2285.26) v2@6978.41,2266.48 ; v2@6965.68,2263.65 ccw(c6953.73,2275.6) 6970.63,2275.6 ccw(c6987.53,2275.6) v2@6975.58,2263.65 ; v2(6970.63,2258.7) 6970.63,2291.89 6983.75,2305 6983.75,2323.15 6948.52,2358.37 6948.52,2427.71 7029.19,2508.37 7065.19,2508.37 7123.52,2566.71 7123.52,2958.37 7490.19,3325.04 7490.19,3525.04 7498.52,3533.37 7832.54,3533.37 7949.21,3650.04 8037.21,3650.04 8098.52,3711.36 8098.52,3983.35 8152.19,4037.02 v1(8152.19,4196.71) ; v1@8145.47,4189.99 cw(c8129.26,4173.77) 8152.19,4173.77 cw(c8175.13,4173.77) v1@8158.91,4189.99 ; v1@8148.3,4192.82 cw(c8138.91,4183.43) 8152.19,4183.43 cw(c8165.47,4183.43) v1@8156.08,4192.82
  Bottom Layer w4: v5@6580.47,5941.34 cw(c6580.47,5922.02) 6594.13,5935.68 cw(c6607.79,5949.34) v5@6588.47,5949.34 ; v5(6580.47,5949.34) 6631.86,5897.95 6631.86,5741.71 6665.19,5708.37 7095.54,5708.37 7167.17,5780 7375.67,5780 7710.33,5445.33 ; 7710,5445 7730,5425 7895,5425 7906.86,5413.14 7906.86,5285.75 8248.69,4943.92 8248.69,4858.69 8147.02,4757.02 8147.02,4201.87 v1(8152.19,4196.71) ; v1@8145.47,4203.43 ccw(c8141.73,4207.17) 8147.02,4207.17 ; 8147.02,4212.8 ccw(c8168.28,4212.8) v1@8153.25,4197.77 ; 8147.02,4222.46 ccw(c8177.94,4222.46) v1@8156.08,4200.6 ; 8147.02,4232.11 ccw(c8187.6,4232.11) v1@8158.91,4203.43
  Bottom Layer w8: v5@6576.23,5953.58 ccw(c6565.99,5963.82) 6580.47,5963.82 ccw(c6594.96,5963.82) v5@6584.72,5953.58 ; v5(6580.47,5949.34) U56.37@6580.47,5980.67
HOST_USB.FIFOADR1: U30.L3 U56.38 | length 7094.5
  Top Layer w8: v2@6970.63,2170.96 cw(c6970.63,2149.23) 6985.99,2164.6 cw(c7001.36,2179.96) v2@6979.63,2179.96 ; v2(6970.63,2179.96) U30.L3@6990.31,2160.28 ; U30.L3@6984.47,2160.28 ccw(c6970.37,2160.28) 6980.34,2170.25 ccw(c6990.31,2180.22) U30.L3@6990.31,2166.12
  MidLayer2 w4: v5@6560.79,6004 cw(c6560.79,5984.69) 6574.44,5998.34 cw(c6588.1,6012) v5@6568.79,6012 ; v5(6560.79,6012) 6581.08,5991.71 6678.84,5991.71 6715.19,5955.36 6715.19,5829.81 6725,5820 6725,5685.49 6828.11,5582.37 7275.13,5582.37 7582.8,5274.71 7616.13,5274.71 7642.84,5248 8005,5248 8025,5268 8053,5268 8081,5240 8211.52,5240 8248.52,5203 8248.52,4076.79 8138.86,3967.12 8138.86,3651.14 8145,3645 8270,3645 8413.52,3645 8448.52,3610 8448.52,3566.71 8023.52,3141.71 8023.52,2500.04 7840.19,2316.71 7826.86,2316.71 7790.19,2280.04 7790.19,2100.04 7715.19,2025.04 7543.19,2025.04 7523.52,2044.71 7487.52,2044.71 7484.52,2041.71 7239.49,2041.71 7225.85,2055.35 7225.85,2069.72 7214.72,2080.85 7082.24,2080.85 7068.37,2094.72 7068.37,2109.09 7057.24,2120.22 7032.01,2120.22 7020.1,2132.14 7015.19,2137.04 7015.19,2166.71 7001.94,2179.96 v2(6970.63,2179.96) ; v2@6975.58,2175.01 cw(c6987.53,2163.06) 6987.53,2179.96 cw(c6987.53,2196.86) v2@6975.58,2184.91 ; v2@6978.41,2172.18 cw(c6997.19,2153.4) 6997.19,2179.96 cw(c6997.19,2206.52) v2@6978.41,2187.74
  Bottom Layer w8: v5@6556.54,6007.76 cw(c6546.3,5997.51) 6560.79,5997.51 cw(c6575.27,5997.51) v5@6565.03,6007.76 ; U56.38@6560.79,5980.67 v5(6560.79,6012)
HOST_USB.FIFOADR2: U30.K3 U56.36 | length 5420.9
  Top Layer w4: v5@6592.16,6012 cw(c6572.84,6012) 6586.5,5998.34 cw(c6600.16,5984.69) v5@6600.16,6004 ; v5(6600.16,6012) 6574.71,5986.55 6555,5986.55 6501.55,5986.55 6475,5960 6475,5693.21 6485.17,5683.04 6738.82,5683.04 6806.86,5615 6806.86,5169.69 6818.5,5158.04 6969.67,5158.04 6970,5158.37 7265.19,5158.37 7491.52,4932.04 7491.52,4900.65 7483.19,4892.32 7483.19,4847.68 7491.52,4839.35 7491.52,4810.37 7478.19,4797.04 7478.19,3997.37 v1(7454.86,3974.04) ; v1@7454.86,3979.54 ccw(c7454.86,3992.82) 7464.25,3983.43 ccw(c7473.64,3974.04) v1@7460.36,3974.04 ; v1@7454.86,3983.54 ccw(c7454.86,4006.48) 7471.07,3990.26 ccw(c7487.29,3974.04) v1@7464.36,3974.04
  Top Layer w8: U30.K3@7029.69,2160.28 v2(7049.37,2179.96) ; U30.K3@7029.69,2166.12 ccw(c7029.69,2180.22) 7039.66,2170.25 ccw(c7049.63,2160.28) U30.K3@7035.53,2160.28 ; v2@7040.37,2179.96 cw(c7018.64,2179.96) 7034.01,2164.6 cw(c7049.37,2149.23) v2@7049.37,2170.96
  MidLayer1 w4: v2@7038.37,2179.96 ccw(c7011.81,2179.96) 7030.59,2198.74 ccw(c7049.37,2217.52) v2@7049.37,2190.96 ; v2@7042.37,2179.96 ccw(c7025.47,2179.96) 7037.42,2191.91 ccw(c7049.37,2203.86) v2@7049.37,2186.96 ; v2(7049.37,2179.96) 7023.52,2205.81 7023.52,2241.71 7056.86,2275.04 7056.86,2391.71 6998.52,2450.04 6998.52,2466.71 7040.19,2508.37 7081.86,2508.37 7348.52,2775.04 7348.52,3216.71 7440.19,3308.37 7440.19,3791.71 7406.86,3825.04 7406.86,3926.04 v1(7454.86,3974.04) ; v1@7445.36,3974.04 cw(c7422.42,3974.04) 7438.64,3957.82 cw(c7454.86,3941.61) v1@7454.86,3964.54 ; v1@7449.36,3974.04 cw(c7436.08,3974.04) 7445.47,3964.65 cw(c7454.86,3955.26) v1@7454.86,3968.54
  Bottom Layer w8: v5@6595.91,6007.76 cw(c6585.67,5997.51) 6600.16,5997.51 cw(c6614.64,5997.51) v5@6604.4,6007.76 ; U56.36@6600.16,5980.67 v5(6600.16,6012)
HOST_USB.FLAGA: U30.G1 U56.29 | length 5735.7
  Top Layer w8: U30.G1@7147.8,2239.02 v2(7167.48,2258.7) ; U30.G1@7147.8,2244.86 ccw(c7147.8,2258.96) 7157.77,2248.99 ccw(c7167.74,2239.02) U30.G1@7153.64,2239.02 ; v2@7158.48,2258.7 cw(c7136.75,2258.7) 7152.12,2243.34 cw(c7167.48,2227.97) v2@7167.48,2249.7
  MidLayer1 w4: v1@6777.52,5957.21 cw(c6777.52,5934.27) 6793.74,5950.49 cw(c6809.96,5966.71) v1@6787.02,5966.71 ; v1@6777.52,5961.21 cw(c6777.52,5947.93) 6786.91,5957.32 cw(c6796.3,5966.71) v1@6783.02,5966.71 ; v1(6777.52,5966.71) 6825,5919.23 6825,5737.86 7118.51,5444.35 7187.55,5444.35 7240.19,5391.71 7899.27,5391.71 7920,5370.98 7920,5123.91 7887.5,5091.41 7887.5,4905.71 8098.52,4694.69 8098.52,4283.37 8173.52,4208.37 8173.52,4185.04 8166.15,4177.66 8166.15,4159.67 8175,4150.82 8175,3884.85 8020,3729.85 8020,3681.57 7945.81,3607.37 7892.37,3607.37 7798.52,3513.52 7798.52,3246.37 7748.52,3196.37 7748.52,2874.43 7581.19,2707.1 7581.19,2693.81 7630,2645 7630,2598.18 v1(7615.19,2583.37)
  Bottom Layer w4: U56.29@6737.95,5980.67 6763.86,5980.67 6777.52,5967 v1(6777.52,5966.71) ; U56.29@6740.78,5977.84 cw(c6747.61,5971.01) 6747.61,5980.67 cw(c6747.61,5990.33) U56.29@6740.78,5983.5 ; v2@7159.7,2266.48 ccw(c7140.92,2285.26) 7167.48,2285.26 ccw(c7194.04,2285.26) v2@7175.26,2266.48 ; v2@7162.53,2263.65 ccw(c7150.58,2275.6) 7167.48,2275.6 ccw(c7184.38,2275.6) v2@7172.43,2263.65 ; v2(7167.48,2258.7) 7167.48,2319 7179.93,2331.45 7440.19,2591.71 7606.86,2591.71 v1(7615.19,2583.37) ; 7572.14,2591.71 cw(c7572.14,2540.32) v1@7608.47,2576.66 ; 7581.79,2591.71 cw(c7581.79,2549.98) v1@7611.3,2579.49 ; 7591.45,2591.71 cw(c7591.45,2559.64) v1@7614.13,2582.31 ; 7601.11,2591.71 cw(c7601.11,2569.29) v1@7616.96,2585.14
HOST_USB.FLAGB: U30.J3 U56.30 | length 5222.6
  Top Layer w4: v1@7341.81,5615.66 cw(c7325.59,5599.44) 7348.52,5599.44 cw(c7371.46,5599.44) v1@7355.24,5615.66 ; v1@7344.64,5618.49 cw(c7335.25,5609.1) 7348.52,5609.1 cw(c7361.8,5609.1) v1@7352.41,5618.49 ; v1(7348.52,5622.37) 7348.52,5370.04 7623.52,5095.04 7623.52,4831.35 7654.52,4800.35 7654.52,4389.37 7615.19,4350.04 7615.19,4307.98 7648.17,4275 7730,4275 7736.48,4268.52 7799.19,4205.81 7799.19,3662.02 7681.86,3544.69 v1(7681.86,3258.04) ; v1@7675.14,3264.76 ccw(c7658.92,3280.98) 7681.86,3280.98 ccw(c7704.79,3280.98) v1@7688.57,3264.76 ; v1@7677.97,3261.93 ccw(c7668.58,3271.32) 7681.86,3271.32 ccw(c7695.14,3271.32) v1@7685.75,3261.93
  Top Layer w8: U30.J3@7069.06,2160.28 v2(7088.74,2179.96) ; U30.J3@7069.06,2166.12 ccw(c7069.06,2180.22) 7079.03,2170.25 ccw(c7089,2160.28) U30.J3@7074.9,2160.28 ; v2@7079.74,2179.96 cw(c7058.01,2179.96) 7073.38,2164.6 cw(c7088.74,2149.23) v2@7088.74,2170.96
  MidLayer2 w4: v5(6718.27,6012) 6761.57,6012 6815.19,5958.37 7012.52,5958.37 v1(7348.52,5622.37) ; v5@6723.92,6006.34 cw(c6737.58,5992.69) 6737.58,6012 cw(c6737.58,6031.31) v5@6723.92,6017.66 ; v2(7088.74,2179.96) 7108.86,2200.08 7108.86,2241.71 7165.19,2298.04 7165.19,2458.37 7264.86,2558.04 7264.86,2678.37 7581.86,2995.37 7581.86,3141.71 7681.86,3241.71 ; v2@7088.74,2186.96 ccw(c7088.74,2203.86) 7100.69,2191.91 ccw(c7112.64,2179.96) v2@7095.74,2179.96 ; v2@7088.74,2190.96 ccw(c7088.74,2217.52) 7107.52,2198.74 ccw(c7126.3,2179.96) v2@7099.74,2179.96 ; v1@7339.02,5622.37 ccw(c7316.09,5622.37) 7332.31,5638.59 ccw(c7348.52,5654.81) v1@7348.52,5631.87 ; v1@7343.02,5622.37 ccw(c7329.75,5622.37) 7339.14,5631.76 ccw(c7348.52,5641.15) v1@7348.52,5627.87 ; v1@7677.16,3249.78 cw(c7672.57,3241.71) 7681.86,3241.71 ; v1(7681.86,3258.04) 7681.86,3241.71 ; v1@7686.55,3249.78 ccw(c7691.15,3241.71) 7681.86,3241.71
  Bottom Layer w8: v5@6714.03,6007.76 cw(c6703.78,5997.51) 6718.27,5997.51 cw(c6732.75,5997.51) v5@6722.51,6007.76 ; U56.30@6718.27,5980.67 v5(6718.27,6012)
HOST_USB.FLAGC: U30.J4 U56.31 | length 6186.4
  Top Layer w4: v1@6650.14,5781.76 ccw(c6633.92,5797.98) 6656.86,5797.98 ccw(c6679.79,5797.98) v1@6663.57,5781.76 ; v1@6652.97,5778.93 ccw(c6643.58,5788.32) 6656.86,5788.32 ccw(c6670.14,5788.32) v1@6660.75,5778.93 ; v1(6656.86,5775.04) 6656.86,5878.71 6698.58,5920.43 v5(6698.58,5949.34) ; v5@6692.93,5943.68 cw(c6679.27,5930.02) 6698.58,5930.02 cw(c6717.9,5930.03) v5@6704.24,5943.68
  Top Layer w8: U30.J4@7069.06,2120.91 v2(7088.74,2140.59) ; U30.J4@7069.06,2126.75 ccw(c7069.06,2140.85) 7079.03,2130.88 ccw(c7089,2120.91) U30.J4@7074.9,2120.91 ; v2@7079.74,2140.59 cw(c7058.01,2140.59) 7073.38,2125.23 cw(c7088.74,2109.86) v2@7088.74,2131.59
  MidLayer2 w4: v1@6650.14,5768.32 cw(c6633.92,5752.11) 6656.86,5752.11 cw(c6679.79,5752.11) v1@6663.57,5768.32 ; v1@6652.97,5771.15 cw(c6643.58,5761.76) 6656.86,5761.76 cw(c6670.14,5761.76) v1@6660.75,5771.15 ; v1(6656.86,5775.04) 6656.86,5731 6821.48,5566.37 7268.5,5566.37 7576.5,5258.37 7609.84,5258.37 7636.21,5232 8208,5232 8240.19,5199.81 8240.19,4079.77 8130.86,3970.43 8130.86,3529.23 8085,3483.37 7965.19,3483.37 7931.86,3516.71 7873.52,3516.71 7856.86,3500.04 7698.52,3500.04 7565.19,3366.71 7565.19,3001.34 7248.52,2684.67 7248.52,2572.37 7056.86,2380.71 7056.86,2255.04 7030.19,2228.37 7030.19,2170.71 7040.14,2160.76 7068.57,2160.76 v2(7088.74,2140.59)
  Bottom Layer w8: v5@6694.34,5953.58 ccw(c6684.1,5963.82) 6698.58,5963.82 ccw(c6713.07,5963.82) v5@6702.83,5953.58 ; v5(6698.58,5949.34) U56.31@6698.58,5980.67
HOST_USB.FLAGD_CS_N: U30.M1 U56.40 | length 6426
  Top Layer w8: v2@6931.26,2249.7 cw(c6931.26,2227.97) 6946.62,2243.34 cw(c6961.99,2258.7) v2@6940.26,2258.7 ; v2(6931.26,2258.7) U30.M1@6950.94,2239.02 ; U30.M1@6945.1,2239.02 ccw(c6931,2239.02) 6940.97,2248.99 ccw(c6950.94,2258.96) U30.M1@6950.94,2244.86
  MidLayer1 w4: v5@6515.76,6006.34 cw(c6502.1,5992.69) 6521.42,5992.69 cw(c6540.73,5992.69) v5@6527.07,6006.34 ; v5@6523.52,6012 6523.52,6014.71 6521.52,6016.71 6521.42,6016.71 6521.42,5793.81 6956.86,5358.37 7281.86,5358.37 7306.86,5333.37 v1(7329.86,5333.37) ; v1@7323.14,5326.66 ccw(c7306.92,5310.44) 7306.92,5333.37 ccw(c7306.92,5356.31) v1@7323.14,5340.09 ; v1@7325.97,5329.49 ccw(c7316.58,5320.1) 7316.58,5333.37 ccw(c7316.58,5346.65) v1@7325.97,5337.26
  MidLayer2 w4: v1@7054.81,2538.43 ccw(c7038.59,2554.64) 7061.52,2554.64 ccw(c7084.46,2554.64) v1@7068.24,2538.43 ; v1@7057.64,2535.6 ccw(c7048.25,2544.99) 7061.52,2544.99 ccw(c7074.8,2544.99) v1@7065.41,2535.6 ; v1(7061.52,2531.71) 7061.52,2586.33 7115.19,2640 7115.19,2961.35 7440,3286.16 7440,3350 ; v1@7329.86,5323.87 cw(c7329.86,5300.94) 7346.07,5317.16 cw(c7362.29,5333.37) v1@7339.36,5333.37 ; v1@7329.86,5327.87 cw(c7329.86,5314.6) 7339.25,5323.99 cw(c7348.64,5333.37) v1@7335.36,5333.37 ; v1(7329.86,5333.37) 7521.52,5141.71 7628.09,5141.71 7694.38,5208 8198.06,5208 8215.86,5190.2 8215.86,4944.36 8131.86,4860.36 8131.86,4028 8090.19,3986.33 8090.19,3714.34 8034.23,3658.37 7946.23,3658.37 7829.56,3541.71 7805.19,3541.71 7456.86,3541.71 7440.19,3525.04 7440.19,3350
  Bottom Layer w4: v2@6923.48,2266.48 ccw(c6903.26,2286.7) 6931.86,2286.7 ; v2@6926.31,2263.65 ccw(c6912.92,2277.04) 6931.86,2277.04 ; v2(6931.26,2258.7) 6931.86,2258.7 6931.86,2333.37 6940.19,2341.71 6940.19,2410.37 v1(7061.52,2531.71) ; 6931.86,2274.16 ccw(c6946.72,2274.16) v2@6936.21,2263.65 ; 6931.86,2283.82 ccw(c6956.37,2283.82) v2@6939.04,2266.48 ; v1@7052.02,2531.71 cw(c7029.09,2531.71) 7045.31,2515.49 cw(c7061.52,2499.27) v1@7061.52,2522.21 ; v1@7056.02,2531.71 cw(c7042.75,2531.71) 7052.14,2522.32 cw(c7061.52,2512.93) v1@7061.52,2526.21
  Bottom Layer w8: v5@6517.17,6007.76 cw(c6506.93,5997.51) 6521.42,5997.51 cw(c6535.9,5997.51) v5@6525.66,6007.76 ; U56.40@6521.42,5980.67 v5(6521.42,6012)
HOST_USB.IFCLK: R249.1 U30.H2 | length 5283.9
  Top Layer w4: v1(6827.86,6337.37) 6929.19,6337.37 6946.06,6320.5 7033.63,6232.93 7057.86,6208.71 7270.21,6208.71 7315.52,6163.39 7315.52,5606.69 7332.52,5589.69 7332.52,5363.06 7607.19,5088.39 7607.19,4825.06 7638.52,4793.73 7638.52,4396 7598.52,4356 7598.52,4311.37 v1(7580.52,4293.37) ; v1@6831.75,6333.49 cw(c6841.14,6324.1) 6841.14,6337.37 cw(c6841.14,6350.65) v1@6831.75,6341.26 ; v1@6834.57,6330.66 cw(c6850.79,6314.44) 6850.79,6337.37 cw(c6850.79,6360.31) v1@6834.57,6344.09 ; v1@7580.52,4298.87 ccw(c7580.52,4312.15) 7589.91,4302.76 ccw(c7599.3,4293.37) v1@7586.02,4293.37 ; v1@7580.52,4302.87 ccw(c7580.52,4325.81) 7596.74,4309.59 ccw(c7612.96,4293.37) v1@7590.02,4293.37
  Top Layer w8: U30.H2@7108.43,2199.65 v2(7128.11,2219.33) ; U30.H2@7108.43,2205.49 ccw(c7108.43,2219.59) 7118.4,2209.62 ccw(c7128.37,2199.65) U30.H2@7114.27,2199.65 ; v2@7119.11,2219.33 cw(c7097.38,2219.33) 7112.75,2203.97 cw(c7128.11,2188.6) v2@7128.11,2210.33
  MidLayer1 w4: v2@7120.33,2227.11 ccw(c7101.55,2245.89) 7128.11,2245.89 ccw(c7154.67,2245.89) v2@7135.89,2227.11 ; v2@7123.16,2224.28 ccw(c7111.21,2236.23) 7128.11,2236.23 ccw(c7145.01,2236.23) v2@7133.06,2224.28 ; v2(7128.11,2219.33) 7128.11,2271.04 7165.19,2308.12 7165.19,2334.98 7449.19,2618.98 7449.19,2853.69 7506.86,2911.36 7506.86,3313.73 7481.86,3338.73 7481.86,3496.31 7572.29,3586.75 7572.29,4177.81 7594.52,4200.04 7594.52,4279.37 v1(7580.52,4293.37)
  Bottom Layer w4: R249.1@6796.18,6360 6825,6360 6827.86,6357.14 ; R249.1@6799.94,6356.24 cw(c6809.02,6347.16) 6809.02,6360 cw(c6809.02,6372.84) R249.1@6799.94,6363.76 ; R249.1@6802.77,6353.41 cw(c6818.68,6337.5) 6818.68,6360 cw(c6818.68,6382.5) R249.1@6802.77,6366.59 ; v1@6821.92,6344.79 ccw(c6812.04,6357.14) 6827.86,6357.14 ; v1(6827.86,6337.37) 6827.86,6357.14 ; v1@6833.79,6344.79 cw(c6843.67,6357.14) 6827.86,6357.14
HOST_USB.INT_N: R252.1 U30.J6 U56.34 | length 5840.6
  Top Layer w4: v5@6639.53,6004 cw(c6639.53,5984.69) 6653.18,5998.34 cw(c6666.84,6012) v5@6647.53,6012 ; v5(6639.53,6012) 6659.82,5991.71 v1(6948.52,5991.71) ; v1@6941.81,5984.99 ccw(c6925.59,5968.77) 6925.59,5991.71 ccw(c6925.59,6014.64) v1@6941.81,5998.43 ; v1@6944.64,5987.82 ccw(c6935.25,5978.43) 6935.25,5991.71 ccw(c6935.25,6004.99) v1@6944.64,5995.6
  Top Layer w8: U30.J6@7069.06,2042.17 v2(7088.74,2061.85) ; U30.J6@7069.06,2048.01 ccw(c7069.06,2062.11) 7079.03,2052.14 ccw(c7089,2042.17) U30.J6@7074.9,2042.17 ; v2@7079.74,2061.85 cw(c7058.01,2061.85) 7073.38,2046.49 cw(c7088.74,2031.12) v2@7088.74,2052.85
  MidLayer1 w4: v5@6631.53,6012 cw(c6612.21,6012) 6625.87,5998.34 cw(c6639.53,5984.69) v5@6639.53,6004 ; v5@6640.19,6012 6640.19,6016.71 6639.53,6016.71 v5(6639.53,6012) 6600,5972.47 6600,5940.23 6609.83,5930.4 7165.19,5375.04 7481.86,5375.04 7673.52,5183.37 7673.52,4810.75 7615.86,4753.08 7615.86,4589 7490.19,4463.33 7490.19,3853.02 7448.52,3811.35 7448.52,3305.39 7356.52,3213.39 7356.52,2704.67 7366.19,2695 7366.19,2654.02 7162.21,2450.04 7118.52,2450.04 7068.52,2400.04 7068.52,2088.37 7090.19,2066.71 7090.19,2061.85 v2(7088.74,2061.85) ; 7072.33,2084.57 cw(c7049.61,2061.85) v2@7081.74,2061.85 ; 7079.16,2077.74 cw(c7063.27,2061.85) v2@7085.74,2061.85 ; 7080.73,2076.17 ccw(c7088.74,2084.18) v2@7088.74,2072.85
  Bottom Layer w4: v1@6941.81,5998.43 ccw(c6925.59,6014.64) 6948.52,6014.64 ccw(c6971.46,6014.64) v1@6955.24,5998.43 ; v1@6944.64,5995.6 ccw(c6935.25,6004.99) 6948.52,6004.99 ccw(c6961.8,6004.99) v1@6952.41,5995.6 ; v1(6948.52,5991.71) 6948.52,6033.37 7006.86,6091.71 7006.86,6182 6998.86,6190 ; R252.1@6983.82,6190 6998.86,6190 ; R252.1@6992.16,6185.85 cw(c6998.86,6182.53) 6998.86,6190 ; R252.1@6992.16,6194.15 ccw(c6998.86,6197.47) 6998.86,6190
  Bottom Layer w8: v5@6635.28,6007.76 cw(c6625.04,5997.51) 6639.53,5997.51 cw(c6654.01,5997.51) v5@6643.77,6007.76 ; U56.34@6639.53,5980.67 v5(6639.53,6012)